# Altium PCB MainBoardPCB_4.PcbDoc (part 29 of 32)
Units mm, origin at the board's own origin, x right, y up, seen from the top; angles counter-clockwise.
Board outline 333.63 x 349.38 mm, 16 copper layers (L1, L2 (GND), L3 (Sign), L4 (GND), L5 (Sign), L6 (PWR/GND), L7(PWR/GND), L8 (Plane_GND), L9 (PWR/GND), L10 (PWR/GND), L11 (PWR/GND), L12 (Sign), L13 (GND), L14 (Sign), L15 (GND), L16), stack 2.502 mm thick; 2205 components, 1648 nets, 8314 pads, 3172 vias.
Unrouted connection lines stored in the file: 5141.
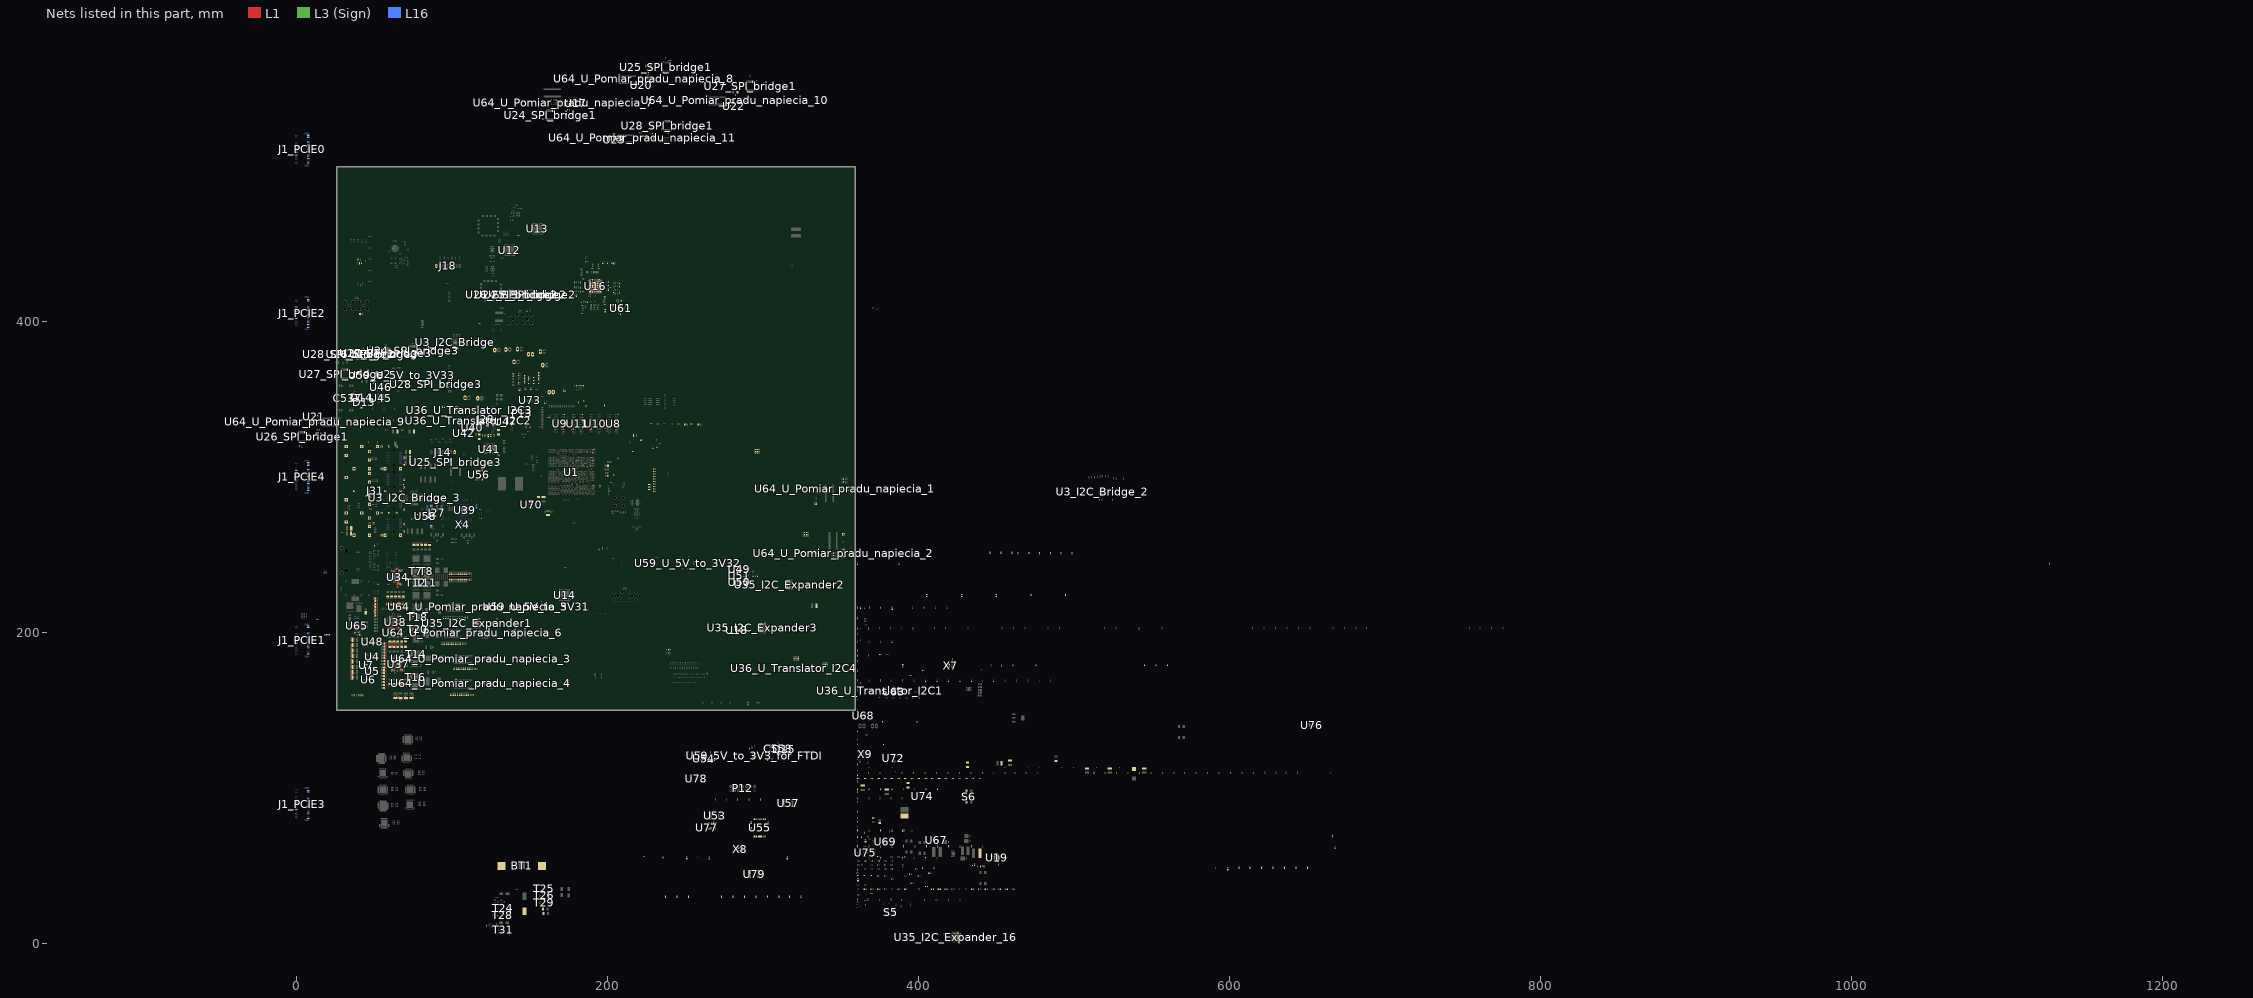
[diagram p29: the nets of this part, all layers, seen from the top]

## Via types
v1: diameter 0.5, hole 0.2, L1 to L16, tented both sides, 1153 vias
v2: diameter 0.5/0.35/0.35/0.35/0.35/0.35/0.35/0.35/0.35/0.35/0.35/0.35/0.35/0.35/0.35/0.5 (per signal layer), hole 0.2, L1 to L16, tented both sides, 548 vias
v3: diameter 0.5, hole 0.2, L1 to L16, 522 vias
v4: diameter 0.5/0.35/0.35/0.35/0.35/0.35/0.35/0.35/0.35/0.35/0.35/0.35/0.35/0.35/0.35/0.5 (per signal layer), hole 0.15, L1 to L16, tented both sides, 266 vias
v5: diameter 0.8, hole 0.4, L1 to L16, tented both sides, 164 vias
v6: diameter 0.35/0/0.35 (per signal layer), hole 0.127, L1 to L3 (Sign), tented both sides, 132 vias
v7: diameter 2.54, hole 1.02, L1 to L16, 125 vias
v8: diameter 1.4, hole 0.5, L1 to L16, tented both sides, 80 vias
v9: diameter 0.35, hole 0.127, L1 to L2 (GND), tented both sides, 36 vias
v10: diameter 0.4, hole 0.2, L1 to L16, 16 vias
v11: diameter 0.25, hole 0.2, L1 to L16, 16 vias
v12: diameter 5, hole 3, L1 to L16, 15 vias
v13: diameter 0.3, hole 0.2, L1 to L16, 15 vias
v14: diameter 0.45, hole 0.15, L1 to L16, 12 vias
v15: diameter 0.5/0.35/0.35/0.35/0.35/0.35/0.35/0.35/0.35/0.35/0.35/0.35/0.35/0.35/0.35/0.45 (per signal layer), hole 0.15, L1 to L16, tented both sides, 10 vias
v16: diameter 0.2/0/0.2 (per signal layer), hole 0.1, L1 to L3 (Sign), tented both sides, 9 vias
v17: diameter 0.4, hole 0.1, L1 to L16, 7 vias
v18: diameter 0.5, hole 0.2, L3 (Sign) to L6 (PWR/GND), tented both sides, 6 vias
v19: diameter 1.65, hole 1.65, L1 to L16, 6 vias
v20: diameter 1.15, hole 1.15, L1 to L16, 6 vias
v21: diameter 0.35/0/0.35 (per signal layer), hole 0.127, L14 (Sign) to L16, tented both sides, 5 vias
v22: diameter 0.2, hole 0.1, L1 to L16, 4 vias
v23: diameter 0.4, hole 0.2, L1 to L16, tented both sides, 2 vias
v24: diameter 0.4, hole 0.15, L1 to L16, 2 vias
v25: diameter 0.508, hole 0.127, L1 to L2 (GND), 2 vias
v26: diameter 0.508, hole 0.127, L2 (GND) to L3 (Sign), 2 vias
v27: diameter 0.5/0.35/0.35/0.35/0.35/0.35/0.35/0.35/0.35/0.35/0.35/0.35/0.35/0.35/0.35/0.5 (per signal layer), hole 0.15, L1 to L16, 2 vias
v28: diameter 0.35, hole 0.127, L3 (Sign) to L6 (PWR/GND), tented both sides, 2 vias
v29: diameter 5.5, hole 3.5, L1 to L16, 1 vias
v30: diameter 0.5/0.35/0.35/0.35/0.35/0.35/0.35/0.35/0.35/0.35/0.35/0.35/0.35/0.35/0.35/0.5 (per signal layer), hole 0.2, L1 to L16, 1 vias
v31: diameter 0.35/0.35/0.35 (per signal layer), hole 0.127, L1 to L3 (Sign), tented both sides, 1 vias
v32: diameter 0.45/0/0.45 (per signal layer), hole 0.15, L1 to L3 (Sign), tented both sides, 1 vias
v33: diameter 0.45/0/0.45 (per signal layer), hole 0.2, L14 (Sign) to L16, tented both sides, 1 vias
v34: diameter 0.35, hole 0.127, L2 (GND) to L3 (Sign), 1 vias
v35: diameter 0.35, hole 0.127, L1 to L2 (GND), 1 vias

## Nets (pads, with @x,y where several pads share a name; then routed paths per layer and width w, separated by ;. In a path a pad name is that pad's centre, name@x,y a point inside that pad or via, vN(x,y) a via of type N, cw(c..) or ccw(c..) an arc to the next point about the centre after c; other vN are vias at no path point) (continued)
eMMC_GND: B1.2 BT1.1 C4.2 C5.2 C6.2 C7.2 C8.1 C9.1 C10.1 C11.1 C12.2 C13.2 C14.2 C15.2 C16.1 C17.1 C18.1 C19.1 C20.1 C21.1 C22.1 C23.1 C24.1 C25.1 C26.1 C27.1 C28.1 C29.1 C30.1 C31.1 C32.1 C33.1 C34.1 C35.1 C37.1 C38.2 C39.1 C40.2 C207.1 C208.2 C209.1 C210.2 C211.1 C212.2 C213.1 C214.2 C215.1 C216.2 C217.1 C218.2 C219.2 C220.2 C221.2 C222.2 C223.1 C224.1 C225.1 C226.1 C227.1 C228.1 C229.1 C230.1 C231.1 C232.1 C233.1 C234.1 C235.1 C236.1 C237.1 C238.1 C239.1 C240.1 C241.1 C242.1 C243.2 C244.2 C245.2 C246.2 C247.1 C248.1 C249.1 C250.1 C251.1 C252.1 C253.1 C254.1 C255.1 C256.1 C257.1 C258.1 C259.1 C260.1 C261.1 C262.1 C263.1 C264.1 C265.1 C266.1 C303_I2C_Bridge.1 C303_I2C_Bridge_2.1 C303_I2C_Bridge_3.1 C304.2 C305.2 C306.2 C307.2 C308.1 C309_U_Pomiar_pradu_napiecia_1.1 C309_U_Pomiar_pradu_napiecia_2.1 C309_U_Pomiar_pradu_napiecia_3.1 C309_U_Pomiar_pradu_napiecia_4.1 C309_U_Pomiar_pradu_napiecia_5.1 C309_U_Pomiar_pradu_napiecia_6.1 C309_U_Pomiar_pradu_napiecia_7.1 C309_U_Pomiar_pradu_napiecia_8.1 C309_U_Pomiar_pradu_napiecia_9.1 C309_U_Pomiar_pradu_napiecia_10.1 C309_U_Pomiar_pradu_napiecia_11.1 C310.1 C311_I2C_Expander1.1 C311_I2C_Expander2.1 C311_I2C_Expander3.1 C311_I2C_Expander?.1 C311_I2C_Expander_10.1 C311_I2C_Expander_11.1 C311_I2C_Expander_12.1 C311_I2C_Expander_13.1 C311_I2C_Expander_14.1 C311_I2C_Expander_15.1 C311_I2C_Expander_16.1 C331.1 C332.1 C347.1 C348.1 C352.1 C353.1 C354.1 C355.1 C358.1 C359.1 C360.1 C361.1 C362.1 C363.1 C364.1 C365.1 C366.1 C367.1 C368.1 C369.1 C370.1 C371.1 C372.1 C373.1 C374.1 C375.1 C376.1 C377.1 C378.1 C379.1 C380.1 C381.1 C382.1 C383.1 C384.1 C385.1 C386.1 C387.1 C388.1 C391.2 C392.1 C396.1 C397.2 C399.2 C400.1 C401.1 C402.1 C403.1 C404.1 C405.1 C406.1 C407.1 C408.1 C409.1 C410.1 C411.1 C412.1 C413.1 C414.1 C415.1 C416.1 C417.1 C418.1 C419.1 C420.1 C421.1 C422.1 C423.1 C424.1 C425.1 C426.1 C427.1 C428.1 C429.1 C432.2 C433.1 C437.1 C438.2 C440.2 C441.1 C442.1 C443.1 C444.1 C445.1 C446.1 C447.1 C448.1 C449.1 C450.1 C451.1 C452.1 C453.1 C454.1 C455.1 C456.1 C457.1 C458.1 C459.1 C460.1 C461.1 C462.1 C463.1 C464.1 C465.1 C466.1 C467.1 C468.1 C469.1 C470.1 C471.1 C472.1 C473.1 C474.1 C480.1 C481.1 C485.1 C486.1 C487.1 C488.1 C489.1 C490.1 C491.1 C492.1 C493.1 C494.1 C495.1 C496.1 C497.1 C498.1 C499.1 C500.1 C501.1 C502.1 C503.1 C504.1 C505.1 C506.1 C507.1 C508.1 C509.1 C510.1 C511.1 C512.1 C513.1 C514.1 C515.1 C516.1 C517.1 C518.1 C519.1 C520.1 C521.1 C522.1 C523.1 C524.1 C537.7 C538.1 C539.1 C544.1 C545.1 C546.1 C547.1 C550.1 C551.1 C552.1 C553.1 C554.1 C555.1 C561.1 C562.1 C585.1 C586.1 C587.1 C606.1 C607.1 C609.1 C610.1 C611.1 C613.1 C614.1 C615.1 C617.1 C618.1 C619.1 C620.1 C621.1 C622.1 C623.1 C624.1 C625.1 C626.1 C631.1 C632.1 C633.1 C636.1 C637.1 C638.1 C645.1 C646.1 C654.1 C655.2 C656.2 C657.2 C674.1 C675.1 C676.1 C678.1 C679.1 C680.1 C705.1 C707.1 C708.1 C709.1 C711.1 C712.1 C719.1 C720.1 C721.1 C722.1 C723.1 C728.1 C729.1 C730.1 C731.1 C732.1 C733.1 C734.1 C735.1 C736.1 C737.1 C738.2 C739.2 C740.1 C741.1 C742.2 C743.1 C744.1 C745.1 C746.1 C747.2 C748.1 C749.1 C750.1 C751.2 C752.1 C753.2 C754.1 C755.1 C756.1 C757.2 C758.1 C759.1 C760.2 C761.1 C762.2 C763.1 C764.2 C765.1 C766.2 C767.2 C768.2 C769.2 C770.1 C771.1 C772.1 C773.1 C774.1 C775.1 C776.1 C777.1 C778.1 C779.1 C780.1 C781.1 C782.1 C783.1 C784.1 C785.1 C786.1 C787.1 C788.1 C789.1 C792.1 D13.3 D14.3 D14.8 D15.3 FB27.1 FB28.2 FB29.1 FB35.1 FB36.1 FB39.1 FB41.1 J14.1 J15.1 J16.1 J17.1 J18.1 J19.1 J20.1 J21.1 J22.1 J23.1 J24.1 J27.1 J27.3 J27.9 J27.15 J27.21 J27.27 J27.33 J27.39 J27.45 J27.51 J27.57 J27.63 J27.65 J27.67 J28.6 J31.SH1 J31.SH2 J31.SH3 J31.SH4 J31.SH5 J31.SH6 J31.SH7 J31.SH8 J31.SH9 J31.SH10 J31.SH11 J31.SH12 J31.SH13 J31.SH14 J31.SH15 J31.SH16 J31.SH17 J31.SH18 J31.SH19 J31.SH20 J31.SH21 J31.SH22 J31.SH23 J31.SH24 J31.SH25 J31.SH26 J31.SH27 J31.SH28 J31.SH29 J31.SH30 J31.SH31 J31.SH32 J31.SH33 J31.SH34 J31.SH35 J31.SH36 J31.SH37 J31.SH38 J31.SH39 J31.SH40 J31.SH41 J31.SH42 J31.SH43 J31.SH44 J31.SH45 J31.SH46 P7.1 P9.1 P11.2 P12.2 P12.4 P12.6 P12.8 P12.10 P12.12 P12.14 R2.1 R14.1 R18.1 R19.1 R21.1 R23.1 R25.1 R26.1 R27.1 R28.1 R56.2 R60.2 R61.2 R62.2 R63.2 R64.2 R73.1 R74.1 R109.1 R114.1 R129.2 R139.1 R167.2 R168.2 R170.2 R172.2 R173.2 R174.1 R178.1 R182.1 R183.1 R187.1 R191.1 R192.1 R196.1 R200.1 R201.1 R205.1 R209.1 R210.1 R214.1 R217.1 R218.1 R228.1 R229.1 R242.2 R244.2 R267.1 R269.1 R274.1 R275.1 R279.2 R280.1 R282.2 R284.1 R292.1 R299.1 R304.1 R317.1 R325.1 R326.1 R327.1 R328.1 R334.2 R341.1 R344.1 R345.1 R379.1 R380.1 R393.1 R396.1 R399.1 R400.2 R450.2 R452.2 R454.2 R456.2 R460.2 R461.1 R464.2 R467.1 R470.2 R472.2 R474.2 R476.2 R478.2 R480.2 R493.2 R495.2 R497.2 R501.2 R503.2 R505.2 R509.2 R511.2 R513.2 R517.2 R519.2 R521.2 R525.2 R527.2 R529.2 R561.1 R565.1 R569.1 R573.1 R577.1 R581.1 R585.1 R589.1 R595.1 R601.1 R629.1 R645.1 R652.1 R668.1 R672.1 R674.1 R675.1 R681.1 R682.1 R683.1 R684.1 R685.1 R690.1 R693.2 R696.2 R698.2 R700.2 R702.2 R704.2 R706.2 R708.2 R714.1 R739.2 R741.2 R743.2 R759.2 R761.2 R763.2 R764.1 R838.2 R840.2 R841.2 S6.1 S6.2 T7.1 T7.2 T7.3 T8.1 T8.2 T8.3 T11.1 T11.2 T11.3 T12.1 T12.2 T12.3 T14.1 T14.2 T14.3 T16.1 T16.2 T16.3 T18.1 T18.2 T18.3 T20.1 T20.2 T20.3 T24.2 T25.2 T26.2 T28.2 T29.2 T31.2 U1.A1 U1.A2 U1.A5 U1.A9 U1.A11 U1.A30 U1.AA9 U1.AA19 U1.AA29 U1.AB2 U1.AB7 U1.AB12 U1.AB17 U1.AB22 U1.AC5 U1.AC10 U1.AC20 U1.AD13 U1.AD18 U1.AD23 U1.AE6 U1.AE16 U1.AE21 U1.AF4 U1.AF9 U1.AF19 U1.AF24 U1.AF29 U1.AG2 U1.AG12 U1.AG22 U1.AH5 U1.AH15 U1.AH20 U1.AH25 U1.AJ3 U1.AJ8 U1.AJ13 U1.AJ18 U1.AJ23 U1.AJ28 U1.AK1 U1.AK30 U1.B3 U1.B4 U1.B7 U1.B11 U1.B13 U1.B17 U1.C1 U1.C2 U1.C5 U1.C9 U1.C11 U1.C15 U1.C20 U1.C25 U1.C30 U1.D3 U1.D4 U1.D7 U1.D11 U1.E1 U1.E2 U1.E5 U1.E9 U1.E11 U1.F3 U1.F4 U1.F7 U1.F11 U1.F14 U1.F24 U1.F25 U1.F26 U1.F27 U1.F28 U1.F29 U1.F30 U1.G1 U1.G2 U1.G5 U1.G9 U1.G11 U1.G17 U1.G22 U1.G23 U1.G24 U1.G27 U1.G28 U1.H3 U1.H4 U1.H7 U1.H11 U1.H20 U1.H22 U1.H26 U1.H29 U1.H30 U1.J1 U1.J2 U1.J5 U1.J9 U1.J10 U1.J11 U1.J13 U1.J22 U1.J24 U1.J27 U1.J28 U1.K3 U1.K4 U1.K9 U1.K22 U1.K26 U1.K29 U1.K30 U1.L1 U1.L2 U1.L5 U1.L9 U1.L12 U1.L16 U1.L18 U1.L22 U1.L24 U1.L28 U1.M3 U1.M4 U1.M7 U1.M9 U1.M11 U1.M13 U1.M15 U1.M17 U1.M22 U1.M26 U1.M29 U1.M30 U1.N1 U1.N2 U1.N5 U1.N9 U1.N12 U1.N14 U1.N16 U1.N23 U1.N24 U1.N25 U1.N26 U1.N27 U1.N28 U1.N29 U1.N30 U1.P3 U1.P4 U1.P7 U1.P9 U1.P11 U1.P13 U1.P15 U1.P17 U1.R1 U1.R2 U1.R5 U1.R9 U1.R12 U1.R16 U1.R21 U1.R26 U1.T3 U1.T4 U1.T7 U1.T8 U1.T11 U1.T13 U1.T17 U1.T19 U1.T24 U1.T29 U1.U1 U1.U2 U1.U5 U1.U7 U1.U12 U1.U16 U1.U22 U1.U27 U1.V3 U1.V4 U1.V7 U1.V9 U1.V11 U1.V13 U1.V20 U1.V25 U1.W1 U1.W2 U1.W5 U1.W6 U1.W12 U1.W14 U1.W16 U1.W18 U1.W23 U1.W28 U1.Y2 U1.Y3 U1.Y4 U1.Y5 U1.Y11 U1.Y13 U1.Y15 U1.Y21 U1.Y26 U3_I2C_Bridge.9 U3_I2C_Bridge.25 U3_I2C_Bridge_2.9 U3_I2C_Bridge_2.25 U3_I2C_Bridge_3.9 U3_I2C_Bridge_3.25 U4.3 U4.6 U4.12 U5.3 U5.6 U5.12 U6.A1 U6.A4 U6.B1 U6.B2 U6.B3 U6.B4 U6.C4 U7.A1 U7.A4 U7.B1 U7.B2 U7.B3 U7.B4 U7.C4 U8.A2 U8.A5 U8.B2 U8.C6 U8.D2 U8.D5 U8.E1 U8.E3 U8.E5 U8.E6 U8.F1 U8.G5 U8.H1 U8.H6 U8.K1 U8.K6 U8.M6 U8.N1 U8.T1 U9.A2 U9.A5 U9.B2 U9.C6 U9.D2 U9.D5 U9.E1 U9.E3 U9.E5 U9.E6 U9.F1 U9.G5 U9.H1 U9.H6 U9.K1 U9.K6 U9.M6 U9.N1 U9.T1 U10.A2 U10.A5 U10.B2 U10.C6 U10.D2 U10.D5 U10.E1 U10.E3 U10.E5 U10.E6 U10.F1 U10.G5 U10.H1 U10.H6 U10.K1 U10.K6 U10.M6 U10.N1 U10.T1 U11.A2 U11.A5 U11.B2 U11.C6 U11.D2 U11.D5 U11.E1 U11.E3 U11.E5 U11.E6 U11.F1 U11.G5 U11.H1 U11.H6 U11.K1 U11.K6 U11.M6 U11.N1 U11.T1 U15.2 U15.10 U17.A1 U17.A4 U17.B1 U17.B2 U17.B3 U17.B4 U17.C4 U18.A1 U18.A4 U18.B1 U18.B2 U18.B3 U18.B4 U18.C4 U19.10 U19.18 U19.27 U19.29 U20.A1 U20.A4 U20.B1 U20.B2 U20.B3 U20.B4 U20.C4 U21.A1 U21.A4 U21.B1 U21.B2 U21.B3 U21.B4 U21.C4 U22.A1 U22.A4 U22.B1 U22.B2 U22.B3 U22.B4 U22.C4 U23.A1 U23.A4 U23.B1 U23.B2 U23.B3 U23.B4 U23.C4 U24_SPI_bridge1.2 U24_SPI_bridge1.10 U24_SPI_bridge2.2 U24_SPI_bridge2.10 U24_SPI_bridge3.2 U24_SPI_bridge3.10 U25_SPI_bridge1.2 U25_SPI_bridge1.10 U25_SPI_bridge2.2 U25_SPI_bridge2.10 U25_SPI_bridge3.2 U25_SPI_bridge3.10 U26_SPI_bridge1.2 U26_SPI_bridge1.10 U26_SPI_bridge2.2 U26_SPI_bridge2.10 U26_SPI_bridge3.2 U26_SPI_bridge3.10 U27_SPI_bridge1.2 U27_SPI_bridge1.10 U27_SPI_bridge2.2 U27_SPI_bridge2.10 U27_SPI_bridge3.2 U27_SPI_bridge3.10 U28_SPI_bridge1.2 U28_SPI_bridge1.10 U28_SPI_bridge2.2 U28_SPI_bridge2.10 U28_SPI_bridge3.2 U28_SPI_bridge3.10 U34.19 U34.22 U35_I2C_Expander1.6 U35_I2C_Expander1.29 U35_I2C_Expander2.6 U35_I2C_Expander2.29 U35_I2C_Expander3.6 U35_I2C_Expander3.29 U35_I2C_Expander_16.6 U35_I2C_Expander_16.29 U36_U_Translator_I2C1.1 U36_U_Translator_I2C2.1 U36_U_Translator_I2C3.1 U36_U_Translator_I2C4.1 U37.19 U37.22 U38.19 U38.22 U39.49 U40.4 U40.9 U41.A6 U41.C4 U41.E7 U41.G5 U41.H10 U41.J5 U41.K8 U41.N2 U41.N5 U41.P4 U41.P6 U42.4 U42.9 U45.23 U45.33 U46.A1 U46.A4 U46.B1 U46.B2 U46.B4 U47.C3 U48.12 U49.4 U49.9 U50.4 U50.9 U51.4 U51.9 U58.2 U58.3 U58.6 U58.7 U63.2 U63.8 U64_U_Pomiar_pradu_napiecia_1.7 U64_U_Pomiar_pradu_napiecia_2.7 U64_U_Pomiar_pradu_napiecia_3.7 U64_U_Pomiar_pradu_napiecia_4.7 U64_U_Pomiar_pradu_napiecia_5.7 U64_U_Pomiar_pradu_napiecia_6.7 U64_U_Pomiar_pradu_napiecia_7.7 U64_U_Pomiar_pradu_napiecia_8.7 U64_U_Pomiar_pradu_napiecia_9.7 U64_U_Pomiar_pradu_napiecia_10.7 U64_U_Pomiar_pradu_napiecia_11.7 U67.2 U68.2 U69.6 U69.17 U70.3 U70.8 U70.13 U70.18 U70.21 U72.7 U73.4 U73.9 U74.3 U75.3 U78.2 X4.2 X4.4 X7.2 X7.4 | length 264.9
  L1 w0.116: v2(177.909,309.05) U1.U22@178.397,309.537 ; v2(179.909,310.052) U1.W23@180.397,310.539 ; v2(183.909,307.052) U1.AC20@184.397,307.539 ; v2(185.909,308.052) U1.AE21@186.397,308.539 ; v2(186.909,306.052) U1.AF19@187.397,306.539 ; v2(186.909,316.052) U1.AF29@187.397,316.539 ; v2(188.909,307.052) U1.AH20@189.397,307.539 ; U1.AH25@189.397,312.539 v2(189.884,313.027) ; v2(189.909,305.052) U1.AJ18@190.397,305.539 ; U1.AJ23@190.397,310.539 v2(190.884,311.027) ; U1.AJ28@190.397,315.539 v2(190.884,315.052) ; U1.AK30@191.397,317.539 v2@191.884,318.027 ; v4@206.343,327.774 v4(206.35,327.774) ; U8.E1@206.857,331.26 U8.E1@206.863,331.254
  L1 w0.2: U9.H6@166.076,333.66 v9(166.076,333.667) ; U9.E3@170.876,331.26 v9(170.876,331.268) ; U11.H6@177.536,333.66 v9(177.536,333.664) ; v9(183.134,330.46) U11.D2@183.136,330.46 ; v9(183.394,309.542) U1.AB22@183.397,309.539 ; v9(183.934,333.663) U11.H1@183.936,333.66 ; U10.A5@189.797,328.06 v9(189.797,328.063) ; v9(200.449,333.66) U8.H6@200.457,333.66 ; v9(205.251,331.26) U8.E3@205.257,331.26 ; v4(205.684,330.088) U8.D2@206.057,330.46 ; U8.F1@206.857,332.06 v4(207.428,332.06) ; U8.H1@206.857,333.66 v4(207.261,334.064) ; U8.K1@206.857,335.26 v4(207.261,335.664) ; U8.N1@206.857,337.66 v4(207.261,338.064) ; U8.T1@206.857,340.06 v4(207.261,340.464) ; U8.E1@206.863,331.254 v4(207.645,331.254)
  L1 w0.25: v1(161.216,338.184) R56.2@162.46,338.184 ; v4(171.272,327.657) U9.A2@171.676,328.06 ; v4(171.272,328.457) U9.B2@171.676,328.86 ; U9.D2@171.676,330.46 v4(172.079,330.864) ; v4(177.133,329.257) U11.C6@177.536,329.66 ; v4(177.133,330.857) U11.E6@177.536,331.26 ; v4(177.933,330.857) U11.E5@178.336,331.26 ; U11.A5@178.336,328.06 178.74,327.657 ; v1(181.909,317.027) U1.AA29@182.397,316.539 ; v4(182.733,327.657) U11.A2@183.136,328.06 ; v4(182.733,328.457) U11.B2@183.136,328.86 ; U11.E1@183.936,331.26 v4(184.507,331.26) ; U11.F1@183.936,332.06 v4(184.507,332.06) ; U11.N1@183.936,337.66 v4(184.34,338.064) ; v4(188.593,330.064) U10.C6@188.997,329.66 ; v4(188.593,331.664) U10.E6@188.997,331.26 ; v4(188.593,334.064) U10.H6@188.997,333.66 ; v4(188.593,337.264) U10.M6@188.997,336.86 ; v4(189.393,330.864) U10.D5@189.797,330.46 ; v4(189.393,331.664) U10.E5@189.797,331.26 ; U10.G5@189.797,332.86 v4(190.2,332.457) ; U8.A2@206.057,328.06 v4@206.343,327.774
  L1 w0.254: U64_U_Pomiar_pradu_napiecia_3.7@116.278,183.659 v5(117.754,183.659) ; U1.AF24@187.397,311.539 v9(187.401,311.535) ; v9(188.394,309.539) U1.AG22@188.397,309.539 ; v1@198.406,331.26 v1(198.495,331.26) U8.E6@200.457,331.26 ; v1(198.653,333.858) v1@198.761,333.858
  L1 w0.3: U1.AD23@185.397,310.539 v9(185.397,310.548) ; U10.E3@193.797,331.26 v1(194.195,331.659) ; U10.D2@194.597,330.46 v9(194.599,330.463) ; U10.E1@195.397,331.26 v9(195.397,331.268) ; U8.B2@206.057,328.86 v9(206.057,328.878)
  L1 w0.5: v1(35.023,183.811) C12.2@36.11,183.811 ; v1(35.023,184.916) C12.2@36.11,184.916 ; v1(35.023,186.012) C12.2@36.11,186.012 ; v1(35.023,187.256) C15.2@36.11,187.256 ; v1(35.023,188.361) C15.2@36.11,188.361 ; v1(35.023,189.458) C15.2@36.11,189.457 ; v1(35.023,190.701) C13.2@36.11,190.701 ; v1(35.023,191.806) C13.2@36.11,191.806 ; v1(35.023,192.903) C13.2@36.11,192.903 ; v1(35.023,194.146) C14.2@36.11,194.146 ; v1(35.023,195.251) C14.2@36.11,195.251 ; v1(35.023,196.348) C14.2@36.11,196.348 ; v1(35.104,169.788) C4.2@36.191,169.788 ; v1(35.104,170.893) C4.2@36.191,170.893 ; v1(35.104,171.99) C4.2@36.191,171.99 ; v1(35.104,173.243) C5.2@36.191,173.243 ; v1(35.104,174.348) C5.2@36.191,174.348 ; v1(35.104,175.445) C5.2@36.191,175.445 ; v1(35.104,176.697) C7.2@36.191,176.697 ; v1(35.104,177.802) C7.2@36.191,177.802 ; v1(35.104,178.899) C7.2@36.191,178.899 ; v1(35.104,180.152) C6.2@36.191,180.152 ; v1(35.104,181.257) C6.2@36.191,181.257 ; v1(35.104,182.353) C6.2@36.191,182.353 ; C12.2@36.11,184.359 v1(37.197,184.359) ; C12.2@36.11,185.464 v1(37.197,185.464) ; C15.2@36.11,187.804 v1(37.197,187.804) ; C15.2@36.11,188.909 v1(37.197,188.909) ; C13.2@36.11,191.249 v1(37.197,191.249) ; C13.2@36.11,192.354 v1(37.197,192.354) ; C14.2@36.11,194.694 v1(37.197,194.694) ; C14.2@36.11,195.799 v1(37.197,195.799) ; C4.2@36.191,170.337 v1(37.278,170.337) ; C4.2@36.191,171.442 v1(37.278,171.442) ; C5.2@36.191,173.791 v1(37.278,173.791) ; C5.2@36.191,174.896 v1(37.278,174.896) ; C7.2@36.191,177.246 v1(37.278,177.246) ; C7.2@36.191,178.351 v1(37.278,178.351) ; C6.2@36.191,180.7 v1(37.278,180.7) ; C6.2@36.191,181.805 v1(37.278,181.805) ; v5(42.6,191.22) R683.1@42.6,192.033 ; R685.1@42.6,195.933 v5(42.6,196.747) ; R684.1@44.716,195.933 v5(44.716,196.747) ; v5(45.775,191.22) R682.1@45.775,192.033 ; v5(46.946,174.081) 47.391,174.081 U5.6@47.56,174.25 ; v5(46.946,175.918) 47.391,175.918 U5.3@47.56,175.75 ; v5(46.946,183.403) 47.391,183.403 U4.6@47.56,183.571 ; v5(46.946,185.24) 47.391,185.24 U4.3@47.56,185.071 ; v1(49.579,210.588) C780.1@50.666,210.588 ; v1(49.579,211.312) C780.1@50.665,211.312 ; v1(49.579,212.483) C779.1@50.666,212.483 ; v1(49.579,213.207) C779.1@50.666,213.207 ; v1(49.579,214.293) C778.1@50.666,214.293 ; v1(49.579,215.016) C778.1@50.666,215.016 ; v1(49.579,216.83) C777.1@50.666,216.83 ; v1(49.579,217.851) C776.1@50.666,217.851 ; v1(49.579,218.575) C776.1@50.666,218.575 ; v1(49.579,219.674) C775.1@50.666,219.674 ; v1(49.579,220.398) C775.1@50.666,220.398 ; v1(49.579,221.488) C774.1@50.666,221.488 ; v1(49.579,222.211) C774.1@50.666,222.211 ; v1(49.579,216.106) C777.1@50.666,216.106 ; U48.12@49.827,194.733 49.996,194.902 v5(50.442,194.902) ; U5.12@49.86,175.75 50.029,175.918 v5(50.475,175.918) ; U4.12@49.86,185.071 50.029,185.24 v5(50.475,185.24) ; R681.1@52.018,194.019 v5(52.018,194.833) ; C20.1@56.419,164.502 v1(57.506,164.502) ; C20.1@56.419,163.778 v1(57.506,163.778) ; C27.1@56.447,165.786 v1(57.534,165.786) ; C27.1@56.446,166.51 v1(57.533,166.51) ; C22.1@56.447,167.684 v1(57.534,167.684) ; C22.1@56.446,168.408 v1(57.533,168.408) ; C21.1@56.447,169.581 v1(57.534,169.581) ; C21.1@56.446,170.305 v1(57.533,170.305) ; C24.1@56.447,171.479 v1(57.534,171.479) ; C24.1@56.446,172.203 v1(57.533,172.203) ; C25.1@56.447,173.377 v1(57.534,173.377) ; C25.1@56.446,174.101 v1(57.533,174.101) ; C23.1@56.447,175.275 v1(57.534,175.275) ; C23.1@56.446,175.999 v1(57.533,175.999) ; C31.1@56.458,179.934 v1(57.545,179.934) ; C30.1@56.458,181.831 v1(57.545,181.831) ; C32.1@56.458,183.729 v1(57.545,183.729) ; C29.1@56.458,185.627 v1(57.545,185.627) ; C28.1@56.458,187.525 v1(57.545,187.525) ; C33.1@56.458,189.423 v1(57.545,189.423) ; C34.1@56.458,191.321 v1(57.545,191.321) ; C31.1@56.459,179.21 v1(57.546,179.21) ; C30.1@56.459,181.108 v1(57.546,181.108) ; C32.1@56.459,183.005 v1(57.546,183.005) ; C29.1@56.459,184.903 v1(57.546,184.903) ; C28.1@56.459,186.801 v1(57.546,186.801) ; C33.1@56.459,188.699 v1(57.546,188.699) ; C34.1@56.459,190.597 v1(57.546,190.597) ; C26.1@56.477,177.173 v1(57.564,177.173) ; C26.1@56.476,177.897 v1(57.563,177.897) ; C35.1@56.484,193.263 v1(57.571,193.263) ; C35.1@56.484,192.539 v1(57.571,192.539) ; v1(58.138,222.101) C392.1@58.138,223.188 ; C397.2@58.206,217.883 v1(58.206,218.97) ; v1(58.776,222.101) C392.1@58.776,223.188 ; C397.2@58.852,217.883 v1(58.852,218.97) ; v1(59.421,222.101) C392.1@59.421,223.188 ; C397.2@59.489,217.883 v1(59.489,218.97) ; v1(59.638,165.636) C433.1@59.638,166.723 ; C438.2@59.645,190.731 v1(59.645,191.818) ; v1(59.653,193.043) C353.1@59.653,194.13 ; v1(60.276,165.636) C433.1@60.276,166.723 ; C438.2@60.29,190.731 v1(60.29,191.818) ; v1(60.29,193.043) C353.1@60.29,194.13 ; v1(60.62,222.101) C391.2@60.62,223.188 ; C396.1@60.688,217.883 v1(60.688,218.97) ; v1(60.921,165.636) C433.1@60.921,166.723 ; C438.2@60.927,190.731 v1(60.927,191.818) ; v1(60.936,193.043) C353.1@60.936,194.13 ; v1(61.258,222.101) C391.2@61.258,223.188 ; C396.1@61.334,217.883 v1(61.334,218.97) ; v1(61.903,222.101) C391.2@61.903,223.188 ; C396.1@61.971,217.883 v1(61.971,218.97) ; v1(62.12,165.636) C432.2@62.12,166.723 ; C437.1@62.127,190.731 v1(62.127,191.818) ; v1(62.135,193.043) C352.1@62.135,194.13 ; C769.2@62.575,157.849 v1(62.575,158.936) ; v1(62.758,165.636) C432.2@62.758,166.723 ; C437.1@62.772,190.731 v1(62.772,191.818) ; v1(62.772,193.043) C352.1@62.772,194.13 ; v1(63.102,222.1) C405.1@63.102,223.187 ; v1(63.124,156.762) C769.2@63.124,157.849 ; C402.1@63.17,217.883 v1(63.17,218.97) ; v1(63.403,165.636) C432.2@63.403,166.723 ; C437.1@63.409,190.731 v1(63.409,191.818) ; v1(63.418,193.043) C352.1@63.418,194.13 ; C769.2@63.68,157.849 v1(63.68,158.936) ; v1(63.74,222.1) C405.1@63.74,223.187 ; C402.1@63.816,217.883 v1(63.816,218.97) ; v1(64.229,156.762) C769.2@64.229,157.849 ; v1(64.385,222.1) C405.1@64.385,223.187 ; C402.1@64.453,217.883 v1(64.453,218.97) ; v1(64.602,165.636) C446.1@64.602,166.723 ; C443.1@64.609,190.731 v1(64.609,191.818) ; v1(64.617,193.043) C374.1@64.617,194.13 ; C769.2@64.777,157.849 v1(64.777,158.936) ; v1(65.24,165.636) C446.1@65.24,166.723 ; C443.1@65.254,190.731 v1(65.254,191.818) ; v1(65.254,193.043) C374.1@65.254,194.13 ; v1(65.584,222.1) C404.1@65.584,223.187 ; C401.1@65.652,217.883 v1(65.652,218.97) ; v1(65.885,165.636) C446.1@65.885,166.723 ; C443.1@65.891,190.731 v1(65.891,191.818) ; v1(65.9,193.043) C374.1@65.9,194.13 ; C768.2@65.979,157.65 v1(65.979,158.737) ; v1(66.222,222.1) C404.1@66.222,223.187 ; C401.1@66.298,217.883 v1(66.298,218.97) ; v1(66.528,156.563) C768.2@66.528,157.65 ; v1(66.867,222.1) C404.1@66.867,223.187 ; C401.1@66.935,217.883 v1(66.935,218.97) ; C768.2@67.084,157.65 v1(67.084,158.737) ; v1(67.085,165.636) C445.1@67.085,166.723 ; C442.1@67.091,190.731 v1(67.091,191.818) ; v1(67.099,193.043) C371.1@67.099,194.13 ; v1(67.632,156.563) C768.2@67.632,157.65 ; v1(67.722,165.636) C445.1@67.722,166.723 ; C442.1@67.736,190.731 v1(67.736,191.818) ; v1(67.736,193.043) C371.1@67.736,194.13 ; v1(68.066,222.07) C403.1@68.066,223.157 ; C400.1@68.134,217.853 v1(68.134,218.94) ; C768.2@68.181,157.65 v1(68.181,158.737) ; v1(68.367,165.636) C445.1@68.367,166.723 ; C442.1@68.373,190.731 v1(68.373,191.818) ; v1(68.382,193.043) C371.1@68.382,194.13 ; v1(68.704,222.07) C403.1@68.704,223.157 ; C400.1@68.78,217.853 v1(68.78,218.94) ; v1(69.349,222.07) C403.1@69.349,223.157 ; C400.1@69.417,217.853 v1(69.417,218.94) ; C767.2@69.419,157.85 v1(69.419,158.937) ; v1(69.567,165.605) C444.1@69.567,166.692 ; C441.1@69.573,190.7 v1(69.573,191.787) ; v1(69.581,193.012) C376.1@69.581,194.099 ; v1(69.967,156.763) C767.2@69.967,157.85 ; v1(70.204,165.605) C444.1@70.204,166.692 ; C441.1@70.218,190.7 v1(70.218,191.787) ; v1(70.218,193.012) C376.1@70.218,194.099 ; C767.2@70.524,157.85 v1(70.524,158.937) ; v1(70.849,165.605) C444.1@70.849,166.692 ; C441.1@70.855,190.7 v1(70.855,191.787) ; v1(70.864,193.012) C376.1@70.864,194.099 ; v1(71.072,156.763) C767.2@71.072,157.85 ; C767.2@71.621,157.85 v1(71.621,158.937) ; C766.2@72.887,157.849 v1(72.887,158.936) ; v1(72.923,170.65) T16.3@74.01,170.65 ; v1(72.923,171.92) T16.2@74.01,171.92 ; v1(72.923,173.19) T16.1@74.01,173.19 ; v1(73.127,185.42) T14.3@74.214,185.42 ; v1(73.127,186.69) T14.2@74.214,186.69 ; v1(73.127,187.96) T14.1@74.214,187.96 ; v1(73.435,156.762) C766.2@73.435,157.849 ; v1(73.987,201.422) T20.3@75.074,201.422 ; v1(73.987,202.692) T20.2@75.074,202.692 ; v1(73.987,203.962) T20.1@75.074,203.962 ; C766.2@73.992,157.849 v1(73.992,158.936) ; v1(74.086,209.067) T18.3@75.173,209.067 ; v1(74.086,210.337) T18.2@75.173,210.337 ; v1(74.086,211.607) T18.1@75.173,211.607 ; v1(74.54,156.762) C766.2@74.54,157.849 ; C348.1@74.983,256.276 v1(74.983,257.362) ; C766.2@75.088,157.849 v1(75.088,158.936) ; C348.1@75.629,256.276 v1(75.629,257.362) ; C348.1@76.266,256.276 v1(76.266,257.362) ; C347.1@77.465,256.276 v1(77.465,257.363) ; C347.1@78.111,256.275 v1(78.111,257.363) ; C347.1@78.748,256.276 v1(78.748,257.363) ; C372.1@79.947,256.275 v1(79.947,257.362) ; C372.1@80.593,256.275 v1(80.593,257.362) ; C372.1@81.23,256.275 v1(81.23,257.362) ; C375.1@82.429,256.275 v1(82.429,257.362) ; C375.1@83.075,256.275 v1(83.075,257.362) ; C375.1@83.712,256.275 v1(83.712,257.362) ; C373.1@84.911,256.245 v1(84.911,257.332) ; C373.1@85.557,256.245 v1(85.557,257.332) ; C373.1@86.194,256.245 v1(86.194,257.332)
  L16 w0.254: v1(198.653,333.858) v1@198.704,333.858
  other v1: 75.092,233.907 76.352,233.907 77.612,233.907 78.872,233.907 82.032,233.914 83.292,233.914 84.552,233.914 85.812,233.914 87.072,234.379 88.332,234.379 89.591,234.379 90.851,234.379 92.111,234.379 93.371,234.379 94.631,234.379 95.891,234.379 97.151,234.379 98.4,234.848 99.089,234.848 99.779,234.848 100.469,234.848 101.159,234.848 101.848,234.848 102.538,234.848 103.228,234.848 103.918,234.848 104.607,234.848 105.297,234.848 105.987,234.848 106.677,234.848 107.366,234.848 108.056,234.848 108.746,234.848 109.436,234.848 110.125,234.848 110.815,234.848 111.505,234.848 112.195,234.848 75.092,235.632 76.352,235.632 77.612,235.632 78.872,235.632 80.488,235.639 82.032,235.639 83.292,235.639 84.552,235.639 85.812,235.639 87.072,235.639 88.332,235.639 89.591,235.639 90.851,235.639 92.111,235.639 93.371,235.639 94.631,235.639 95.891,235.639 97.151,235.639 98.411,235.639 99.101,235.639 99.79,235.639 100.48,235.639 101.17,235.639 101.86,235.639 102.55,235.639 103.239,235.639 103.929,235.639 104.619,235.639 105.309,235.639 105.998,235.639 106.688,235.639 107.378,235.639 108.068,235.639 108.757,235.639 109.447,235.639 110.137,235.639 110.827,235.639 111.516,235.639 112.206,235.639 98.411,236.461 99.101,236.461 99.79,236.461 100.48,236.461 101.17,236.461 101.86,236.461 102.55,236.461 103.239,236.461 103.929,236.461 104.619,236.461 105.309,236.461 105.998,236.461 106.688,236.461 107.378,236.461 108.068,236.461 108.757,236.461 109.447,236.461 110.137,236.461 110.827,236.461 111.516,236.461 112.206,236.461 87.072,236.899 88.332,236.899 89.591,236.899 90.851,236.899 92.111,236.899 93.371,236.899 94.631,236.899 95.891,236.899 97.151,236.899 75.129,237.339 76.389,237.339 77.649,237.339 78.909,237.339 82.069,237.346 83.328,237.346 84.588,237.346 85.848,237.346 179.397,312.539 181.397,313.539 202.619,326.479 199.72,329.552
  other v2: 162.397,288.539 164.397,288.539 166.397,288.539 168.397,288.539 170.397,288.539 172.397,288.539 174.397,288.539 176.397,288.539 178.397,288.539 180.397,288.539 191.397,288.539 162.397,289.539 164.397,289.539 166.397,289.539 168.397,289.539 170.397,289.539 172.397,289.539 174.397,289.539 176.397,289.539 178.397,289.539 180.397,289.539 181.397,289.539 183.397,289.539 188.397,289.539 163.397,290.539 165.397,290.539 167.397,290.539 169.397,290.539 171.397,290.539 173.397,290.539 175.397,290.539 177.397,290.539 179.397,290.539 181.397,290.539 190.397,290.539 163.397,291.539 165.397,291.539 167.397,291.539 169.397,291.539 171.397,291.539 173.397,291.539 175.397,291.539 177.397,291.539 179.397,291.539 181.397,291.539 187.397,291.539 162.397,292.539 164.397,292.539 166.397,292.539 168.397,292.539 170.397,292.539 172.397,292.539 174.397,292.539 176.397,292.539 178.397,292.539 180.397,292.539 181.397,292.539 184.397,292.539 189.397,292.539 180.397,293.539 186.397,293.539 163.397,294.539 165.397,294.539 167.397,294.539 169.397,294.539 173.397,294.539 175.397,294.539 177.397,294.539 178.397,294.539 179.397,294.539 183.397,294.539 177.397,295.539 190.397,295.539 162.397,296.539 164.397,296.539 166.397,296.539 168.397,296.539 170.397,296.539 171.397,296.539 172.397,296.539 173.397,296.539 174.397,296.539 175.397,296.539 176.397,296.539 179.397,296.539 182.397,296.539 187.397,296.539 170.397,297.539 184.397,297.539 162.397,298.539 163.397,298.539 164.397,298.539 165.397,298.539 166.397,298.539 167.397,298.539 168.397,298.539 169.397,298.539 170.397,298.539 173.397,298.539 175.397,298.539 177.397,298.539 179.397,298.539 181.397,298.539 172.397,299.539 174.397,299.539 176.397,299.539 178.397,299.539 180.397,299.539 183.397,299.539 188.397,299.539 163.397,300.539 170.397,300.539 173.397,300.539 175.397,300.539 177.397,300.539 179.397,300.539 181.397,300.539 185.397,300.539 190.397,300.539 167.397,301.539 174.397,301.539 180.397,301.539 164.397,302.539 173.397,302.539 175.397,302.539 181.397,302.539 189.397,302.539 172.397,303.539 174.397,303.539 176.397,303.539 178.397,303.539 180.397,303.539 186.397,303.539 163.397,304.539 168.397,304.539 173.397,304.539 175.397,304.539 177.397,304.539 183.397,304.539 172.397,305.539 180.397,305.539 185.397,305.539 177.397,306.539 182.397,306.539 164.397,307.539 169.397,307.539 179.397,307.539 176.397,308.539 181.397,308.539 168.397,309.539 169.397,309.539 170.397,309.539 171.397,309.539 172.397,309.539 173.397,309.539 168.397,310.539 174.397,310.539 167.397,311.539 168.397,311.539 170.397,311.539 172.397,311.539 174.397,311.539 177.397,311.539 164.397,312.539 167.397,312.539 174.397,312.539 167.397,313.539 169.397,313.539 171.397,313.539 173.397,313.539 174.397,313.539 176.397,313.539 167.397,314.539 168.397,314.539 170.397,314.539 174.397,314.539 178.397,314.539 167.397,315.539 168.397,315.539 170.397,315.539 172.397,315.539 174.397,315.539 180.397,315.539 167.397,316.539 169.397,316.539 171.397,316.539 173.397,316.539 174.397,316.539 177.397,316.539 162.397,317.539 164.397,317.539 167.397,317.539 169.397,317.539 171.397,317.539 173.397,317.539 174.397,317.539 191.789,317.932
  other v3: 422.421,2.45 423.521,2.45 424.622,2.45 425.722,2.45 422.421,3.55 423.521,3.55 424.622,3.55 425.722,3.55 422.421,4.65 423.521,4.65 424.622,4.65 425.722,4.65 422.421,5.75 423.521,5.75 424.622,5.75 425.722,5.75 449.881,54.043 450.981,54.043 449.881,55.143 450.981,55.143 449.881,56.243 450.981,56.243 378.182,64.701 379.282,64.701 378.182,65.801 379.282,65.801 297.925,201.163 299.025,201.163 300.125,201.163 301.225,201.163 297.925,202.263 299.025,202.263 300.125,202.263 301.225,202.263 297.925,203.363 299.025,203.363 300.125,203.363 301.225,203.363 114.517,204.214 115.617,204.214 116.717,204.214 117.817,204.214 297.925,204.463 299.025,204.463 300.125,204.463 301.225,204.463 114.517,205.314 115.617,205.314 116.717,205.314 117.817,205.314 114.517,206.414 115.617,206.414 116.717,206.414 117.817,206.414 114.517,207.514 115.617,207.514 116.717,207.514 117.817,207.514 315.304,229.007 316.404,229.007 317.504,229.007 318.604,229.007 315.304,230.107 316.404,230.107 317.504,230.107 318.604,230.107 315.304,231.207 316.404,231.207 317.504,231.207 318.604,231.207 284.331,231.604 285.331,231.604 315.304,232.307 316.404,232.307 317.504,232.307 318.604,232.307 284.331,232.604 285.331,232.604 284.458,235.864 285.458,235.864 284.458,236.864 285.458,236.864 284.458,240.182 285.458,240.182 284.458,241.182 285.458,241.182 107.614,276.725 108.984,276.725 106.499,277.84 107.614,277.84 108.984,277.84 110.099,277.84 106.499,279.21 107.614,279.21 108.984,279.21 110.099,279.21 107.614,280.325 108.984,280.325 150.014,281.103 150.914,281.103 151.814,281.103 150.014,282.003 150.914,282.003 151.814,282.003 150.014,282.904 150.914,282.904 151.814,282.904 107.039,327.546 108.039,327.546 107.039,328.546 108.039,328.546 112.67,331.021 113.67,331.021 112.67,332.021 113.67,332.021 149.744,348.735 150.744,348.735 149.744,349.735 150.744,349.735
  other v9: 194.597,328.06 201.257,328.06 194.597,328.86 200.457,329.66 201.257,330.46 172.476,331.26 182.336,331.26 201.257,331.26 172.476,332.06 195.397,332.06 178.336,332.86 201.257,332.86 172.476,333.66 195.392,333.667 166.076,335.26 177.536,335.26 195.392,335.267 200.457,335.26 177.536,336.86 200.457,336.86 195.392,340.067
  other v11: 52.801,349.155 53.821,349.155 54.841,349.155 55.861,349.155 52.801,350.175 53.821,350.175 54.841,350.175 55.861,350.175 52.801,351.195 53.821,351.195 54.841,351.195 55.861,351.195 52.801,352.215 53.821,352.215 54.841,352.215 55.861,352.215
  other v13: 75.769,285.72 74.924,286.567 75.769,286.567 76.594,286.567 75.769,287.417 518.223,289.525 517.379,290.373 518.223,290.373 519.048,290.373 518.223,291.223 102.07,385.766 101.225,386.613 102.07,386.613 102.895,386.613 102.07,387.463
  other v14: 66.65,205.714 66.599,207.218
eMMC_PG1: R340.1 U40.5
eMMC_PG2: R343.1 R345.2 U42.5
eMMC_rst: R99.1 R797.1 U41.K5 | length 10.4
  L1 w0.254: U41.K5@122.938,319.091 v16(122.949,319.091)
  L3 (Sign) w0.098: v16(122.949,319.091) 123.199,319.341 124.94,319.341 130.638,313.643 130.831,313.643
eMMC_Vcc: C517.2 C518.2 C523.2 C586.2 FB25.1 R339.2 R340.2 U40.8 U41.E6 U41.F5 U41.J10 U41.K9
eMMC_VccQ: C519.2 C520.2 C524.2 C587.2 FB25.2 R342.2 R343.2 U41.C6 U41.M4 U41.N4 U41.P3 U41.P5 U42.8
eMMC_Vddim: C521.2 C522.2 U41.C2
EN1: U35_I2C_Expander2.23 U61.20
EN1_TPS: R277.2 R278.2 U34.14 U34.27 U70.20 | length 21.1
  L1 w0.254: R278.2@64.339,240.856 64.783,240.856 65.822,239.817 U34.27@65.822,237.639 ; v6(65.39,229.317) 65.295,229.412 65.295,231.213 65.815,231.733 65.815,232.984 65.82,232.989 65.82,233.137 U34.14@65.822,233.139
  L3 (Sign) w0.254: v6(65.39,229.317) 65.1,229.607 65.1,237.122 65.822,237.843 65.822,240.309 65.39,240.741 65.39,241.677
EN2: U35_I2C_Expander2.24 U61.6
EN2_TPS: R745.1 U70.6 U70.17
EN_0.85V_REG1: S5.8 U34.1 U34.8
En_0V85@2A: R296.2 R435.2 U37.14 | length 1.9
  L1 w0.254: U37.14@66.175,177.317 66.177,177.315 66.177,176.889 66.836,176.23 66.841,176.23 67.204,175.867 R296.2@67.204,175.817
EN_1V0@1.5A: R634.1 U51.3 U68.4
EN_1V8@1.5A: R633.1 U50.3 U68.5
EN_2V5@1.5A: R632.1 U49.3 U68.6
EN_3V3V_REG0: S5.6 U37.1
EN_5V_REG0: S5.7 U38.8
EN_12@8A: S5.5 U38.1
EN_Detect_KEY: R655.2
En_PCIE_I2C: 
En_PCIE_SPI: 
EN_PS_LTC6952_1: U35_I2C_Expander2.20 U59_U_5V_to_3V33.3
EN_PS_LTC6952_2: U35_I2C_Expander2.22 U59_U_5V_to_3V32.3
EN_PS_LTC6952_3: U35_I2C_Expander2.17 U59_U_5V_to_3V31.3
En_PWRSwitch_PCIE0: U17.A2
En_PWRSwitch_PCIE1: U20.A2
En_PWRSwitch_PCIE2: U21.A2
En_PWRSwitch_PCIE3: U22.A2
En_PWRSwitch_PCIE4: U23.A2
EN_SEQ_LT3504: R646.2 U67.3 U69.5
EN_SPI_A_Q0: R232_SPI_bridge3.1
EN_SPI_A_Q1: R234_SPI_bridge3.1
EN_SPI_A_Q2: R235_SPI_bridge3.2
EN_SPI_A_Q3: R237_SPI_bridge3.2
EN_SPI_A_Q4: R239_SPI_bridge3.1
EN_SPI_B_Q0: R232_SPI_bridge1.1
EN_SPI_B_Q1: R234_SPI_bridge1.1
EN_SPI_B_Q2: R235_SPI_bridge1.2
EN_SPI_B_Q3: R237_SPI_bridge1.2
EN_SPI_B_Q4: R239_SPI_bridge1.1
EN_SPI_C_Q0: R232_SPI_bridge2.1
EN_SPI_C_Q1: R234_SPI_bridge2.1
EN_SPI_C_Q2: R235_SPI_bridge2.2
EN_SPI_C_Q3: R237_SPI_bridge2.2
EN_SPI_C_Q4: R239_SPI_bridge2.1
EN_VSUP_1V2: C626.2 R309.1 U19.12
EN_VSUP_1V8: C625.2 R308.1 U19.15
EN_VSUP_3V3: C624.2 R305.1 U19.14
Enable_CLK: U12.40 U13.40 U14.40
EXPANDER_RESET: J21.2 P13.2 R811.1
Ext_EZS_N: R82.1 U1.AK6 U12.48
Ext_EZS_P: R82.2 U1.AK7 U12.47
FB1/FB2: R271.1 R273.2 U34.10 U34.31 | length 12.3
  L1 w0.254: R271.1@61.041,239.87 61.041,239.82 v24(61.441,239.42) ; v17(62.82,232.364) 63.543,232.364 63.82,232.64 63.82,233.137 U34.10@63.822,233.139 ; R273.2@62.939,239.52 62.822,239.403 v17(62.822,238.22) 62.831,238.229 63.571,238.229 63.82,237.981 63.82,237.641 U34.31@63.822,237.639
  L16 w0.254: v24(61.441,239.42) 62.674,239.42 62.774,239.52 v24(62.814,239.52) ; v17(62.82,232.364) 62.821,232.365 v17(62.822,238.22) v17(62.822,238.22)
FB1_1: R287.1 R290.2 U37.31
FB1_2: R626.1 R627.2 U38.31 | length 3.3
  L1 w0.254: R626.1@59.997,209.711 60.008,209.722 60.932,209.722 R627.2@60.944,209.733 61.102,209.575 62.252,209.575 62.453,209.374 U38.31@62.453,208.714
FB2_1: R297.1 R300.2 U37.10 | length 4.1
  L1 w0.254: R300.2@61.068,175.851 R297.1@62.14,175.851 62.14,176.257 62.455,176.572 63.749,176.572 64.175,176.997 U37.10@64.175,177.317
FB2_2: R315.1 R318.2 U38.10 | length 3.5
  L1 w0.254: R318.2@60.114,202.723 R315.1@61.041,202.723 61.041,203.148 61.384,203.491 62.28,203.491 62.453,203.664 U38.10@62.453,204.214
Flag_PWRSwitch_PCIE0: R602.2 U17.A3
Flag_PWRSwitch_PCIE1: R603.2 U20.A3
Flag_PWRSwitch_PCIE2: R604.2 U21.A3
Flag_PWRSwitch_PCIE3: R605.2 U22.A3
Flag_PWRSwitch_PCIE4: R606.2 U23.A3
FPGA_Vcc_HD: C605.2 C606.2 C607.2 C610.2 C611.2 C756.2 C759.2 L16.2 R212.2 R365.1 R395.2 R398.2 R618.2 R659.2 R660.2 R661.2 R662.2 R663.2 R664.2 R688.2 R744.2 R817.2 R818.2 R819.2 R820.2 R821.2 R822.2 R823.2 R824.2 U1.AA4 U1.AC15 U1.AD3 U1.AD8 U1.AE11 U1.AF14 U1.AG7 U1.AG17 U1.AH10 U1.D13 U1.E10 U1.E16 U1.G10 U1.G12 U1.H15 U1.H25 U1.K25 U1.L27 U15.1 U15.7 U15.8 U15.16 U36_U_Translator_I2C1.2 U36_U_Translator_I2C4.2 U79.15
  other v2: 185.397,290.539 182.397,291.539 188.397,294.539 185.397,295.539 166.397,297.539 168.397,297.539 189.397,297.539 186.397,298.539 168.397,299.539 165.397,300.539 187.397,301.539 169.397,302.539 184.397,302.539 166.397,303.539 188.397,304.539 169.397,312.539 171.397,312.539 172.397,314.539
FPGA_Vcc_HP: R363.1 R364.1 R506.1 R507.1 R514.1 R515.1 R522.1 R523.1 R530.1 R531.1 R546.1 R547.1 R548.1 R549.1 R550.1 R551.1 R552.1 R553.1 R554.1 R555.1 R556.1 R557.1 R735.1
FTD_DS_Dir1: R411.2 R412.2 U56.1
FTD_DS_Dir2: R413.2 R414.2 U56.2
FTD_DS_Dir3: R415.2 R416.2 U56.7
FTD_DS_Dir4: R418.2 R421.2 U56.8
FTD_JTAG_Dir1: R402.2 R403.2 U53.1
FTD_JTAG_Dir2: R404.2 R405.2 U53.2
FTD_JTAG_Dir3: R406.2 R407.2 U53.7
FTD_JTAG_Dir4: R408.2 R409.2 U53.8
FTD_U1_DIR1: R722.2 R723.2 U79.1
FTD_U1_DIR2: R724.2 R725.2 U79.2
FTD_U1_DIR3: R726.2 R727.2 U79.7
FTD_U1_DIR4: R728.2 R729.2 U79.8
FTD_U_DIR1: R636.2 R637.2 U57.1
FTD_U_DIR2: R638.2 R639.2 U57.2
FTD_U_DIR3: R640.2 R641.2 U57.7
FTD_U_DIR4: R642.2 R643.2 U57.8
FTDI_5V: C559.2 C560.2 C563_5V_to_3V3_for_FTDI.2 C564_5V_to_3V3_for_FTDI.2 FB31.1 U59_5V_to_3V3_for_FTDI.1 U59_5V_to_3V3_for_FTDI.2 U59_5V_to_3V3_for_FTDI.3
FTDI_DM: C558.2 D15.2 U55.7
FTDI_DP: C558.3 D15.1 U55.8
FTDI_EECLK: R417.2 U54.4 U55.62
FTDI_EECS: R420.2 U54.5 U55.63
FTDI_EED: R419.1 U54.3 U55.61
FTDI_GND: C559.1 C560.1 C563_5V_to_3V3_for_FTDI.1 C564_5V_to_3V3_for_FTDI.1 C565_5V_to_3V3_for_FTDI.1 C566_5V_to_3V3_for_FTDI.1 C567_5V_to_3V3_for_FTDI.1 C658.1 C659.1 C660.1 C661.1 C662.1 C663.1 C664.1 C665.1 C666.1 C667.1 C668.1 C669.1 C670.1 C671.1 C673.1 C791.1 FB32.1 R403.1 R405.1 R407.1 R409.1 R412.1 R414.1 R416.1 R421.1 R423.1 R432_5V_to_3V3_for_FTDI.1 R637.1 R639.1 R641.1 R643.1 R723.1 R725.1 R727.1 R729.1 U53.10 U54.2 U55.1 U55.5 U55.10 U55.11 U55.13 U55.15 U55.25 U55.35 U55.47 U55.51 U56.10 U57.10 U59_5V_to_3V3_for_FTDI.4 U59_5V_to_3V3_for_FTDI.9 U77.2 U79.10 X8.2 X8.4
  other v3: 293.848,120.188 294.848,120.188 293.848,121.188 294.848,121.188
FTDI_JTAG_ON: U55.21
FTDI_JTAG_ON_1: R401.1 U53.9
FTDI_JTAG_ON_2: R410.1 U56.9
FTDI_JTAG_ON_3: R635.1 U57.9
FTDI_JTAG_ON_4: R721.1 U79.9
FTDI_LS_UART0_RXD: U55.27 U79.4
FTDI_LS_UART0_TXD: U55.26 U79.3
FTDI_LS_UART2_CTS_B: U55.41
FTDI_LS_UART2_RTS_B: U55.40
FTDI_LS_UART2_RXD: U55.39 U57.6
FTDI_LS_UART2_TXD: U55.38 U57.5
FTDI_LS_UART_RXD: U55.52 U57.4
FTDI_LS_UART_TXD: U55.48 U57.3
FTDI_PS_POR: U55.23 U77.1
FTDI_PS_SRST+B: U55.24 U77.3
FTDI_Sock_GND: C558.5 FB32.2
FTDI_TCK: P12.5 R732.1 U53.5 U55.16 U56.5
FTDI_TDI: P12.9 R734.1 U53.3 U55.17 U56.3
FTDI_TDO: P12.7 R733.1 U53.6 U55.18 U56.6
FTDI_TMS: P12.3 R731.1 U53.4 U55.19 U56.4
FTDI_VBUS: C558.1 FB31.2
FTDI_VCC1P8: C665.2 C666.2 C667.2 C673.2 U55.12 U55.37 U55.49 U55.64
FTDI_VccIO: C565_5V_to_3V3_for_FTDI.2 C566_5V_to_3V3_for_FTDI.2 C567_5V_to_3V3_for_FTDI.2 C658.2 C668.2 C669.2 C670.2 C671.2 C791.2 FB43.1 FB44.1 R401.2 R402.1 R404.1 R406.1 R408.1 R410.2 R411.1 R413.1 R415.1 R417.1 R418.1 R420.1 R422.2 R424.1 R430_5V_to_3V3_for_FTDI.2 R431_5V_to_3V3_for_FTDI.2 R635.2 R636.1 R638.1 R640.1 R642.1 R721.2 R722.1 R724.1 R726.1 R728.1 U53.16 U54.6 U55.20 U55.31 U55.42 U55.50 U55.56 U56.16 U57.16 U59_5V_to_3V3_for_FTDI.8 U77.5 U79.16
FTDI_X_IN: C663.2 U55.2 X8.1
FTDI_X_OUT: C664.2 U55.3 X8.3
GEM3_MDC: R815.1
GEM3_MDIO: R816.1
GND_PCIe_PCIE0: C1_PCIE0.1 C2_PCIE0.1 C3_PCIE0.1 J1_PCIE0.1 J1_PCIE0.3 J1_PCIE0.9 J1_PCIE0.15 J1_PCIE0.21 J1_PCIE0.24 J1_PCIE0.27 J1_PCIE0.30 J1_PCIE0.33 J1_PCIE0.34 J1_PCIE0.38 J1_PCIE0.39 J1_PCIE0.42 J1_PCIE0.45 J1_PCIE0.48 J1_PCIE0.51 J1_PCIE0.54 J1_PCIE0.57 J1_PCIE0.59 J1_PCIE0.61 J1_PCIE0.63 J1_PCIE0.65 J1_PCIE0.67
GND_PCIe_PCIE1: C1_PCIE1.1 C2_PCIE1.1 C3_PCIE1.1 J1_PCIE1.1 J1_PCIE1.3 J1_PCIE1.9 J1_PCIE1.15 J1_PCIE1.21 J1_PCIE1.24 J1_PCIE1.27 J1_PCIE1.30 J1_PCIE1.33 J1_PCIE1.34 J1_PCIE1.38 J1_PCIE1.39 J1_PCIE1.42 J1_PCIE1.45 J1_PCIE1.48 J1_PCIE1.51 J1_PCIE1.54 J1_PCIE1.57 J1_PCIE1.59 J1_PCIE1.61 J1_PCIE1.63 J1_PCIE1.65 J1_PCIE1.67
GND_PCIe_PCIE2: C1_PCIE2.1 C2_PCIE2.1 C3_PCIE2.1 J1_PCIE2.1 J1_PCIE2.3 J1_PCIE2.9 J1_PCIE2.15 J1_PCIE2.21 J1_PCIE2.24 J1_PCIE2.27 J1_PCIE2.30 J1_PCIE2.33 J1_PCIE2.34 J1_PCIE2.38 J1_PCIE2.39 J1_PCIE2.42 J1_PCIE2.45 J1_PCIE2.48 J1_PCIE2.51 J1_PCIE2.54 J1_PCIE2.57 J1_PCIE2.59 J1_PCIE2.61 J1_PCIE2.63 J1_PCIE2.65 J1_PCIE2.67
GND_PCIe_PCIE3: C1_PCIE3.1 C2_PCIE3.1 C3_PCIE3.1 J1_PCIE3.1 J1_PCIE3.3 J1_PCIE3.9 J1_PCIE3.15 J1_PCIE3.21 J1_PCIE3.24 J1_PCIE3.27 J1_PCIE3.30 J1_PCIE3.33 J1_PCIE3.34 J1_PCIE3.38 J1_PCIE3.39 J1_PCIE3.42 J1_PCIE3.45 J1_PCIE3.48 J1_PCIE3.51 J1_PCIE3.54 J1_PCIE3.57 J1_PCIE3.59 J1_PCIE3.61 J1_PCIE3.63 J1_PCIE3.65 J1_PCIE3.67
GND_PCIe_PCIE4: C1_PCIE4.1 C2_PCIE4.1 C3_PCIE4.1 J1_PCIE4.1 J1_PCIE4.3 J1_PCIE4.9 J1_PCIE4.15 J1_PCIE4.21 J1_PCIE4.24 J1_PCIE4.27 J1_PCIE4.30 J1_PCIE4.33 J1_PCIE4.34 J1_PCIE4.38 J1_PCIE4.39 J1_PCIE4.42 J1_PCIE4.45 J1_PCIE4.48 J1_PCIE4.51 J1_PCIE4.54 J1_PCIE4.57 J1_PCIE4.59 J1_PCIE4.61 J1_PCIE4.63 J1_PCIE4.65 J1_PCIE4.67
GPIO_ETH_EXPANDER: R715.1 U76.2
GPIO_Exp0_Adress0: R492.1 R493.1
GPIO_Exp0_Adress1: R494.1 R495.1
GPIO_Exp0_Adress2: R496.1 R497.1
GPIO_Exp0_Int0: R661.1 U1.AA6
  other v2: 182.397,293.539
GPIO_Exp0_Int1: R662.1 U1.AA5
  other v2: 182.397,292.539
GPIO_Exp1_Adress0: R500.1 R501.1
GPIO_Exp1_Adress1: R502.1 R503.1
GPIO_Exp1_Adress2: R504.1 R505.1
GPIO_Exp1_Int0: R663.1 U1.AD2
  other v2: 185.397,289.539
GPIO_Exp1_Int1: R664.1 U1.AE2
  other v2: 186.397,289.539
GPIO_Exp2_Adress0: R508.1 R509.1
GPIO_Exp2_Adress1: R510.1 R511.1
GPIO_Exp2_Adress2: R512.1 R513.1
GPIO_Exp2_Int0: R688.1 U1.AD1
  other v2: 185.397,288.539
GPIO_Exp2_Int1: R744.1 U1.AE1
  other v2: 186.397,288.539
GPIO_Exp3_Adress0: R516.1 R517.1
GPIO_Exp3_Adress1: R518.1 R519.1
GPIO_Exp3_Adress2: R520.1 R521.1
GPIO_Exp3_Int0: R817.1 U1.AC3
  other v2: 184.397,290.539
GPIO_Exp3_Int1: R818.1 U1.AC2
  other v2: 184.397,289.539
GPIO_Exp4_Adress0: R524.1 R525.1
GPIO_Exp4_Adress1: R526.1 R527.1
GPIO_Exp4_Adress2: R528.1 R529.1
GPIO_Exp4_Int0: R819.1 U1.AA3
  other v2: 182.397,290.539
GPIO_Exp4_Int1: R820.1 U1.AB3
  other v2: 183.397,290.539
GPIO_Exp5_Adress0: R697.1 R698.1
GPIO_Exp5_Adress1: R699.1 R700.1
GPIO_Exp5_Adress2: R701.1 R702.1
GPIO_Exp5_Int0: R821.1 U1.AB1
  other v2: 183.397,288.539
GPIO_Exp5_Int1: R822.1 U1.AC1
  other v2: 184.397,288.539
GPIO_Exp6_Adress0: R703.1 R704.1 U35_I2C_Expander_16.13
GPIO_Exp6_Adress1: R705.1 R706.1 U35_I2C_Expander_16.12
GPIO_Exp6_Adress2: R707.1 R708.1 U35_I2C_Expander_16.11
GPIO_Exp6_Int0: R823.1 U1.AA2 U35_I2C_Expander_16.16
  other v2: 182.397,289.539
GPIO_Exp6_Int1: R824.1 U1.AA1 U35_I2C_Expander_16.15
  other v2: 182.397,288.539
GPIO_Exp_Reset0: R746.1
GPIO_Exp_Reset1: R747.1
GPIO_Exp_Reset1.SCL: R559_I2C_Bridge_2.1 U3_I2C_Bridge_2.2
GPIO_Exp_Reset1.SDA: R560_I2C_Bridge_2.1 U3_I2C_Bridge_2.1
GPIO_Exp_Reset2: R748.1
GPIO_Exp_Reset3: R749.1
GPIO_Exp_Reset4: R750.1
GPIO_Exp_Reset5: R751.1
GPIO_Exp_Reset6: R752.1 U35_I2C_Expander_16.14
Ground: C63.2 C64.2 C67.2 C70.2 C75.2 C76.2 C77.2 C78.1 C79.1 C80.1 C81.2 C82.2 C83.2 C88.2 C89.2 C90.2 C91.2 C92.2 C93.2 C96.2 C99.1 C100.1 C101.1 C102.1 C103.1 C104.1 C105.1 C106.1 C107.1 C108.1 C109.1 C110.1 C124.1 C125.1 C126.1 C127.1 C141.1 C142.1 C143.1 C144.1 C145.1 C146.1 C147.1 C148.1 C162.1 C163.1 C164.1 C165.1 C179.1 C180.1 C572.1 C574.1 C575.1 C576.1 C578.1 C579.1 C590.1 C591.1 C592.1 FB36.2 R437.1 R439.1 R545.1 U16.44 U16.65 U61.3 U61.8 U61.13 U61.18 U61.21 X9.2
  other v3: 207.596,407.546 208.496,407.546 209.396,407.546 207.596,408.446 208.496,408.446 209.396,408.446 207.596,409.346 208.496,409.346 209.396,409.346 189.86,418.916 191.05,418.916 192.24,418.916 193.43,418.916 194.62,418.916 188.64,420.136 189.86,420.136 191.05,420.136 192.24,420.136 193.43,420.136 194.62,420.136 195.84,420.136 188.64,421.326 189.86,421.326 191.05,421.326 192.24,421.326 193.43,421.326 194.62,421.326 195.84,421.326 188.64,422.516 189.86,422.516 191.05,422.516 192.24,422.516 193.43,422.516 194.62,422.516 195.84,422.516 188.64,423.706 189.86,423.706 191.05,423.706 192.24,423.706 193.43,423.706 194.62,423.706 195.84,423.706 188.64,424.896 189.86,424.896 191.05,424.896 192.24,424.896 193.43,424.896 194.62,424.896 195.84,424.896 189.86,426.116 191.05,426.116 192.24,426.116 193.43,426.116 194.62,426.116
Ground_PWR_PoE: C702.1 C703.1 C704.1 D27.2 R159.1 R160.1 R667.1 R670.2 U65.3 U65.8 U65.21 | length 4.9
  L1 w0.254: v1(37.668,199.124) R670.2@37.668,199.938 ; v1(38.76,201.663) U65.3@38.76,202.478 ; v1(40.17,199.307) C702.1@40.17,200.121 ; U65.8@40.6,204.318 v1(41.478,204.318) ; v1(42.978,201.451) R667.1@42.978,202.265 ; R160.1@42.978,203.203 v1(43.793,203.203)
  other v3: 38.21,203.768 39.31,203.768 38.21,204.868 39.31,204.868
HI_Speed_En_PCIE0: 
HI_Speed_En_PCIE1: 
HI_Speed_En_PCIE2: 
HI_Speed_En_PCIE3: 
HI_Speed_En_PCIE4: 
HI_Speed_PWR_En: 
HI_Speed_PWR_En_I2C: 
HI_Speed_PWR_En_SPI: 
HI_Speed_PWR_nRST: 
HW_Conf_05028: R128.1 R129.1 U16.64
I2C0_En: 
I2C0_Reset: 
I2C0Master_SCL: J12.1 R85.1 R774.1 U36_U_Translator_I2C3.3
I2C0Master_SDA: J12.2 R86.1 R775.1 U36_U_Translator_I2C3.4
I2C1_En: U35_I2C_Expander1.19
I2C1_Reset: U35_I2C_Expander1.17
I2C1Master_SCL: J13.1 R83.1 R772.1 U36_U_Translator_I2C2.3
I2C1Master_SDA: J13.2 R84.1 R773.1 U36_U_Translator_I2C2.4
I2C_05028_SCL: R130.2 R132.1 U16.36
I2C_05028_SDA: R131.2 R134.1 U16.35
I2C_SCL_SFP0: R559_I2C_Bridge_3.1 U3_I2C_Bridge_3.2
I2C_SCL_SFP1: R227_I2C_Bridge_3.1 U3_I2C_Bridge_3.4
I2C_SCL_SFP2: R225_I2C_Bridge_3.1 U3_I2C_Bridge_3.6
I2C_SCL_SFP3: R223_I2C_Bridge_3.1 U3_I2C_Bridge_3.8
I2C_SDA_SFP0: R560_I2C_Bridge_3.1 U3_I2C_Bridge_3.1
I2C_SDA_SFP1: R558_I2C_Bridge_3.1 U3_I2C_Bridge_3.3
I2C_SDA_SFP2: R226_I2C_Bridge_3.1 U3_I2C_Bridge_3.5
I2C_SDA_SFP3: R224_I2C_Bridge_3.1 U3_I2C_Bridge_3.7
I2CFPGA_Master_SCL: R363.2 U1.AG1 U36_U_Translator_I2C1.3 U36_U_Translator_I2C4.3
  other v2: 188.397,288.539
I2CFPGA_Master_SDA: R364.2 U1.AF3 U36_U_Translator_I2C1.4 U36_U_Translator_I2C4.4
  other v2: 187.397,290.539
ILIM1: C345.2 R610.1 U34.26 | length 3.2
  L1 w0.254: U34.26@66.321,237.64 C345.2@66.32,239.69 66.38,239.63 67.318,239.63 R610.1@67.378,239.57
ILIM1_1: C389.2 R619.1 U37.26 | length 2.5
  L1 w0.254: U37.26@66.675,181.817 66.675,182.331 67.04,182.696 67.474,182.696 C389.2@68.211,183.433
ILIM1_2: C430.2 R625.2 U38.26 | length 3
  L1 w0.254: U38.26@64.953,208.714 64.953,209.219 65.973,210.239 66.991,210.239 R625.2@67.001,210.229
ILIM2: C349.2 R611.1 U34.15 | length 3.5
  L1 w0.254: C349.2@66.055,231.087 66.075,231.067 R611.1@67.093,231.067 ; U34.15@66.322,233.139 66.322,232.29 66.315,232.283 66.94,231.658 66.94,231.22 R611.1@67.093,231.067 ; R611.1@67.113,231.047 R611.1@67.093,231.067
ILIM2_1: C393.2 R620.1 U37.15 | length 2.6
  L1 w0.254: U37.15@66.675,177.317 66.675,176.892 66.983,176.584 67.861,176.584 68.185,176.26 C393.2@68.185,175.817
ILIM2_2: C434.2 R302.2 U38.15 | length 2.6
  L1 w0.254: U38.15@64.953,204.214 64.955,204.212 64.955,203.839 65.578,203.216 C434.2@65.578,202.764 66.405,202.764 66.453,202.812 R302.2@66.453,202.813
IMU_INT1: R426.1 R530.2 U1.AD11 U58.4
  other v2: 185.397,298.539
IMU_INT2: R425.1 R531.2 U1.AD10 U58.9
  other v2: 185.397,297.539
InSel_05028_00: U16.20
InSel_05028_01: U16.17
InSel_05028_10: U16.28
InSel_05028_11: U16.29
INTA_EXP_MAIN: U1.AE3
  other v2: 186.397,290.539
INTB_EXP_MAIN: U1.Y1
  other v2: 181.397,288.539
Interrupt0: R506.2 U1.AC12 U64_U_Pomiar_pradu_napiecia_3.3
  other v2: 184.397,299.539
Interrupt1: R507.2 U1.AD12 U64_U_Pomiar_pradu_napiecia_4.3
  other v2: 185.397,299.539
Interrupt2: R514.2 U1.AA12 U64_U_Pomiar_pradu_napiecia_5.3
  other v2: 182.397,299.539
Interrupt3: R515.2 U1.AA11 U64_U_Pomiar_pradu_napiecia_6.3
  other v2: 182.397,298.539
Interrupt4: R522.2 U1.AB11 U35_I2C_Expander1.16
  other v2: 183.397,298.539
Interrupt5: R523.2 U1.AC11 U72.3
  other v2: 184.397,298.539
Interrupt8: R546.2 U1.AB10 U35_I2C_Expander3.16
  other v2: 183.397,297.539
Interrupt9: R547.2 U1.AB9 U35_I2C_Expander3.15
  other v2: 183.397,296.539
Interrupt10: R548.2 U1.Y10
  other v2: 181.397,297.539
Interrupt11: R549.2 U1.AA10 U35_I2C_Expander1.23 U64_U_Pomiar_pradu_napiecia_1.3
  other v2: 182.397,297.539
Interrupt12: R550.2 U1.AC9 U35_I2C_Expander1.24 U64_U_Pomiar_pradu_napiecia_2.3
  other v2: 184.397,296.539
Interrupt13: R551.2 U1.AD9 U35_I2C_Expander1.15
  other v2: 185.397,296.539
Interrupt14: R552.2 U1.AC6
  other v2: 184.397,293.539
Interrupt15: R553.2 U1.AD6
  other v2: 185.397,293.539
Interrupt16: R554.2 U1.W8 U64_U_Pomiar_pradu_napiecia_7.3
  other v2: 180.397,295.539
Interrupt17: R555.2 U1.Y8 U64_U_Pomiar_pradu_napiecia_8.3
  other v2: 181.397,295.539
Interrupt18: R556.2 U1.Y7 U64_U_Pomiar_pradu_napiecia_9.3
  other v2: 181.397,294.539
Interrupt19: R557.2 U1.AA7 U64_U_Pomiar_pradu_napiecia_10.3
  other v2: 182.397,294.539